# Altium PCB HFPB_01-PCB.PcbDoc (part 3 of 5)
Units mm, origin at the board's own origin, x right, y up, seen from the top; angles counter-clockwise.
Board outline 125 x 200 mm, 8 copper layers (Top Layer, Signal Layer 1, Signal Layer 2, Signal Layer 3, Signal Layer 4, Signal Layer 5, Signal Layer 6, Bottom Layer), stack 1.53 mm thick; 382 components, 179 nets, 1080 pads, 272 vias.
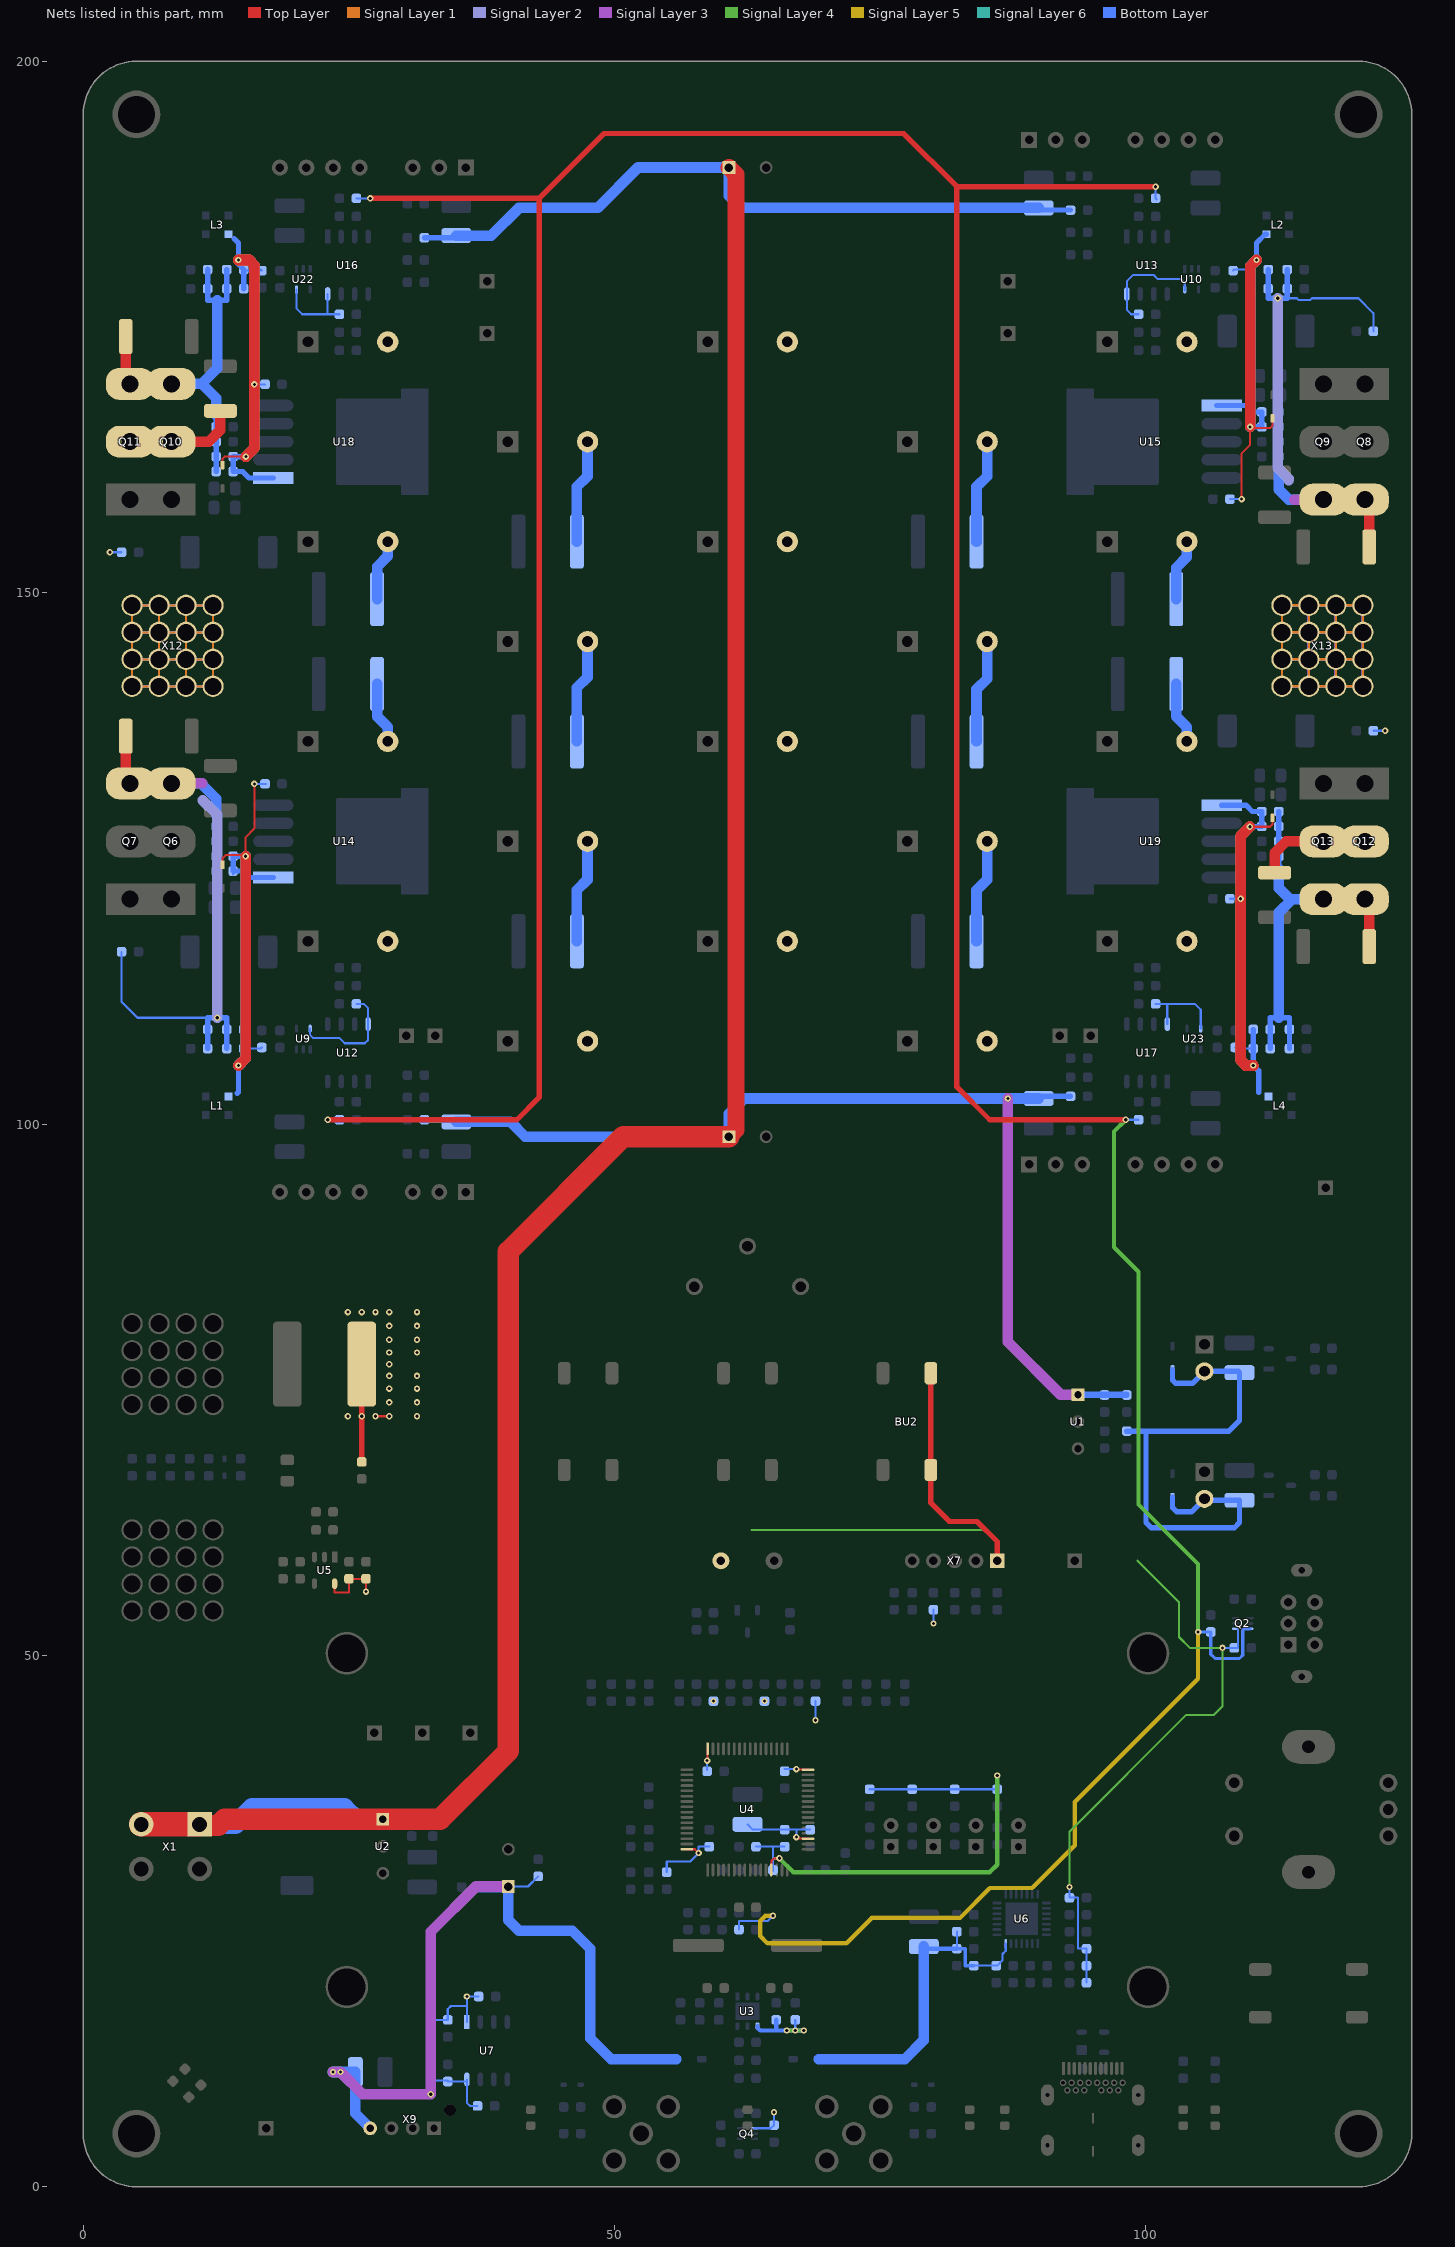
[diagram p8: the nets of this part, all layers, seen from the top]

## Part data (continued)
X10 X11 X12 X13: "Screw Terminal M6 16 pin", Manufacturer="Wurth Elektronik", Package/Case="Through Hole", CompType=Connector, Datasheet link=https://www.we-online.de/katalog/datasheet/7461097.pdf, Digikey link=https://www.digikey.com/en/products/detail/w%C3%BCrth-elektronik/7461097/2682508, Digikey number=732-3217-ND, Mating with="M6 connector", Mouser link=https://www.mouser.com/ProductDetail/Wurth-Elektronik/7461097/?qs=%2Fha2pyFaduivfHmPS%2FalO0LxillnNa7WBZ9739yqip0%3D, Mouser number=710-7461097, Part Description="Screw Terminal M6 16 pin", Part number=7461097, Price per 1p (1), $=5.15, Price per 1p (1000), $=3.00
Y1: library part ECS-80-20-5PX-TR, "Crystal 8MHz", Manufacturer="ECS Inc.", Package/Case=HC-49/US, Value1=20pF, Value2=30ppm, Value3=60Ohm, CompType=Crystal, Datasheet link=https://ecsxtal.com/store/pdf/csm-7x.pdf, Digikey link=https://www.digikey.com/product-detail/en/ecs-inc/ECS-80-20-5PX-TR/XC2076CT-ND/5875560, Digikey number=XC2076CT-ND, Mouser link=https://www.mouser.com/ProductDetail/ECS/ECS-80-20-5PX-TR?qs=wYonFgBYHKlzFXpOtPA%2FIw%3D%3D, Mouser number=520-80-20-5PX-T, Part Description="Crystal 8MHz 20pF 30ppm", Part number=ECS-80-20-5PX-TR, Price per 1p (1), $=0.30, Price per 1p (1000), $=0.18

## Free pads (board coordinates)
  round 4 hole 3.5: 0(24.8,18.8) 0(24.8,50.2) 0(100.2,18.8) 0(100.2,50.2)

## Via types
v1: diameter 0.6, hole 0.3, Top Layer to Bottom Layer, tented both sides, 272 vias

## Nets (pads, with @x,y where several pads share a name; then routed paths per layer and width w, separated by ;. In a path a pad name is that pad's centre, name@x,y a point inside that pad or via, vN(x,y) a via of type N, cw(c..) or ccw(c..) an arc to the next point about the centre after c; other vN are vias at no path point)
+3.3V: BU2.3 BU2.4 C18.1 C21.1 C22.1 C23.1 C24.1 C25.1 C31.1 C36.1 FB4.1 LS1.P Q2.4 Q4.4 R18.2 R19.1 R34.1 R42.2 R46.2 R56.2 R57.2 R58.2 R59.2 R71.2 R72.2 R76.2 R77.2 R78.2 R80.2 U3.4 U4.19 U4.32 U4.48 U4.64 U5.5 U7.1 X7.1 | length 152.7
  Top Layer w0.2: U5.5@23.65,56.75 23.65,55.9 25,55.9 C31.1@25,57.2 R42.2@26.6,57.2 v1(26.6,56) ; U4.64@56.8,31.75 57.55,31.75 v1(57.9,31.4) ; v1(58.7,40.1) 58.75,40.15 U4.48@58.75,41.2 ; v1(67.1,32.9) 67.25,32.75 U4.19@68.2,32.75 ; v1(67.1,39.3) 67.15,39.25 U4.32@68.2,39.25
  Top Layer w0.5: BU2.4@79.75,76.55 BU2.3@79.75,67.45 79.75,64.35 81.5,62.6 84.1,62.6 86,60.7 X7.1@86,58.9
  Signal Layer 4 w0.2: 62.9,61.8 85,61.8 86,60.8 X7.1@86,58.9 ; v1(92.8,28.2) 92.8,33.4 103.8,44.4 106.4,44.4 107.2,45.2 v1(107.2,50.7) 104.125,50.7 103.1,51.725 103.1,55 99.2,58.9
  Signal Layer 4 w0.4: v1(66.2,14.7) v1(67,14.7) v1(67.8,14.7)
  Bottom Layer w0.2: R72.2@32.7,15.7 R71.2@34.3,15.7 34.3,16.7 34.6,17 36.095,17 ; U7.1@36.095,15.5 36.095,17 ; C36.1@37.2,17.9 v1(36.095,17.9) 36.095,17 ; R80.2@54.9,29.6 54.9,30.6 57.1,30.6 v1(57.9,31.4) 57.9,32 C23.1@58.9,32 ; C22.1@58.7,39.2 v1(58.7,40.1) ; C25.1@62.5,34.1 63,33.6 FB4.1@66,33.6 67.1,33.6 ; Q4.4@63.175,5.5 64.7,5.5 R34.1@65,5.8 v1(65,7) ; C21.1@66,39.3 v1(67.1,39.3) ; v1(67,14.7) R19.1@67,15.7 ; v1(67.1,32.9) 67.1,33.6 ; C24.1@68.4,33.6 67.1,33.6 ; v1(68.9,43.9) 68.9,43.8 R77.2@68.9,45.7 ; v1(80,53) R46.2@80,54.3 ; v1(92.8,28.2) R57.2@92.8,27.2 93.6,27.2 93.6,22.4 R58.2@94.4,22.4 R59.2@94.4,20.8 R56.2@94.4,19.2 ; v1(107.2,50.7) R18.2@108.3,50.7 108.65,50.7 108.65,52.45 Q2.4@108.6,52.5
  Bottom Layer w0.4: U3.4@63.45,15.105 63.45,14.95 63.7,14.7 65.1,14.7 ; C18.1@65.2,15.7 65.2,14.8 65.1,14.7 ; v1@66.95,14.7 v1(66.2,14.7) 65.1,14.7 ; v1(67,14.7) v1(67.8,14.7)
  other v1: 59.3,45.7 64.1,45.7
+3.3V': FB10.1 FB11.1 FB12.1 FB13.1 Q2.3 R17.1 R20.2 | length 418
  Top Layer w0.5: v1(23,100.4) 40.8,100.4 42.9,102.5 42.9,187.1 ; v1(27,187.1) 42.9,187.1 ; v1(98.1,100.4) 85.3,100.4 82.2,103.5 82.2,188.2 ; v1(100.9,188.2) 82.2,188.2 ; 42.9,187.1 49,193.2 77.2,193.2 82.2,188.2
  Signal Layer 4 w0.4: v1(98.1,100.4) 97,99.3 97,88.4 99.3,86.1 99.3,64.2 104.9,58.6 v1(104.9,52.2)
  Signal Layer 5 w0.4: v1(64.9,25.5) 64.2,25.5 63.7,25 63.7,23.6 64.4,22.9 71.8,22.9 74.2,25.3 82.5,25.3 85.3,28.1 89.3,28.1 93.3,32.1 93.3,36.2 104.9,47.8 v1(104.9,52.2)
  Bottom Layer w0.2: v1(23,100.4) FB10.1@24.1,100.4 ; FB12.1@25.7,187.1 v1(27,187.1) ; R17.1@61.7,24.2 61.7,25 64.4,25 v1(64.9,25.5) ; v1(98.1,100.4) 98,100.4 FB13.1@99.3,100.4 ; v1(100.9,188.2) FB11.1@100.9,187.1 FB11.1@101,187
  Bottom Layer w0.3: v1(104.9,52.2) R20.2@106.1,52.2 106.1,50.1 106.5,49.7 108.8,49.7 109.1,50 109.1,52.4 109.2,52.5 Q2.3@109.775,52.5
+3.3VA: C28.1 C29.1 FB4.2 R2.2 R22.2 R74.2 R75.2 U4.13 | length 51.7
  Top Layer w0.2: U4.13@64.75,29.8 64.75,30.65 65,30.9 v1(65.5,30.9)
  Signal Layer 4 w0.4: v1(65.5,30.9) 66.8,29.6 85.3,29.6 86,30.3 v1(86,38.7)
  Bottom Layer w0.2: C29.1@63.3,32 FB4.2@66,32 64.9,32 ; 64.6,32 64.9,32 ; C28.1@64.9,29.7 C28.1@64.9,29.8 64.9,30.9 ; v1(65.5,30.9) 64.9,30.9 ; R22.2@74,37.4 R2.2@78,37.4 R75.2@82,37.4 R74.2@86,37.4 v1(86,38.7) ; 64.9,30.9 64.9,32
+5.0V: C11.P C12.1 C34.1 C35.1 D4.A FB2.1 R69.2 R70.2 U7.8 X9.4 | length 85.8
  Signal Layer 3 w1: v1(23.5,10.8) v1(24.2,10.8) 26.3,8.7 v1(32.7,8.7) 32.7,24 36.95,28.25 C11.P@40,28.25
  Bottom Layer w0.2: C34.1@25.6,10.6 C34.1@25.8,10.8 ; v1(32.7,8.7) R69.2@32.7,9.9 ; R69.2@32.7,10 34.3,10 R70.2@34.3,9.9 U7.8@36.095,9.9 ; U7.8@36.095,10.1 U7.8@36.095,9.9 ; C35.1@37.1,7.6 36.4,7.6 36.095,7.905 U7.8@36.095,9.9 ; C11.P@39.95,28.2 C11.P@40,28.25 41.85,28.25 C12.1@42.8,29.2
  Bottom Layer w1: v1(23.5,10.8) v1(24.2,10.8) C34.1@25.6,10.8 ; C34.1@25.6,10.6 25.6,6.9 X9.4@27,5.5 ; FB2.1@37.2,28.2 C11.P@39.95,28.2 ; C11.P@40,28.25 40,25.1 41,24.1 46,24.1 47.706,22.394 47.706,13.962 49.667,12 D4.A@55.8,12
+5.0V_1: C92.1 U9.5 U12.8 | length 10.8
  Bottom Layer w0.2: U9.5@21.35,108.975 21.35,108.35 21.6,108.1 24.1,108.1 24.6,107.6 26.5,107.6 26.805,107.905 U12.8@26.805,109.4 26.805,110.895 26.4,111.3 C92.1@25.7,111.3
+5.0V_2: C108.1 U16.8 U22.5 | length 8
  Bottom Layer w0.2: U22.5@20.05,178.525 20.05,176.75 20.6,176.2 22.995,176.2 ; U16.8@22.995,178.1 22.995,176.2 ; C108.1@24.1,176.2 22.995,176.2
+5.0V_3: C93.1 U10.5 U13.8 | length 10.7
  Bottom Layer w0.2: C93.1@99.3,176.2 98.6,176.2 98.195,176.605 U13.8@98.195,178.1 98.195,179.295 98.8,179.9 100.7,179.9 101.1,179.5 103.3,179.5 103.65,179.15 U10.5@103.65,178.525 U10.5@103.65,178.425
+5.0V_4: C109.1 U17.8 U23.5 | length 8.2
  Bottom Layer w0.2: C109.1@100.9,111.3 102.005,111.3 ; U17.8@102.005,109.4 102.005,111.3 ; U23.5@105.15,108.975 105.15,110.75 104.6,111.3 102.005,111.3
+5.0V_USB: C37.2 C38.1 D3.A FB5.2 R60.1 R61.1 U6.7 | length 32.2
  Bottom Layer w0.2: C38.1@79.1,22.9 C38.1@79.6,22.4 ; R60.1@82.2,22.4 R61.1@82.2,24 ; FB5.2@83.8,20.8 86,20.8 86.5,21.3 86.5,21.9 86.8,22.2 U6.7@86.8,22.875
  Bottom Layer w0.3: R60.1@82.2,22.4 83,22.4 83,20.8 FB5.2@83.8,20.8
  Bottom Layer w0.4: C38.1@79.6,22.4 R60.1@82.2,22.4
  Bottom Layer w1: D3.A@69.2,12 77.3,12 79.1,13.8 C38.1@79.1,22.6
+5V_1: C80.2 C89.1 C100.2 C101.2 C104.1 C105.1 C112.1 Q6.3 Q7.3 Q10.2 Q11.2 R85.1 R87.2 R99.1 R100.1 X12.1 | length 436.3
  Top Layer w0.2: Q6.3@7.6,132.75 Q6.3@8.3,132.05
  Top Layer w1: R100.1@4,136.5 4,132.45 Q7.3@4.4,132.05 ; Q10.2@8.3,164.2 11.8,164.2 12.9,165.3 C112.1@12.9,167.1
  Signal Layer 3 w0.2: X12.1@4.59,141.19 X12.1@4.59,143.73 X12.1@4.59,146.27 X12.1@4.59,148.81 ; X12.1@4.6,141.18 7.14,141.18 9.68,141.18 X12.1@12.22,141.18 ; X12.1@4.6,143.72 7.14,143.72 9.68,143.72 X12.1@12.22,143.72 ; X12.1@4.6,146.26 7.14,146.26 9.68,146.26 X12.1@12.22,146.26 ; X12.1@4.6,148.8 7.14,148.8 9.68,148.8 X12.1@12.22,148.8 ; X12.1@7.13,141.19 X12.1@7.13,143.73 X12.1@7.13,146.27 X12.1@7.13,148.81 ; X12.1@9.67,141.19 X12.1@9.67,143.73 X12.1@9.67,146.27 X12.1@9.67,148.81 ; X12.1@12.21,141.19 X12.1@12.21,143.73 X12.1@12.21,146.27 X12.1@12.21,148.81
  Signal Layer 3 w1: Q6.3@8.3,132.05 11.192,132.05
  Signal Layer 4 w0.2: X12.1@4.59,141.19 X12.1@4.59,143.73 X12.1@4.59,146.27 X12.1@4.59,148.81 ; X12.1@4.6,141.18 7.14,141.18 9.68,141.18 X12.1@12.22,141.18 ; X12.1@4.6,143.72 7.14,143.72 9.68,143.72 X12.1@12.22,143.72 ; X12.1@4.6,146.26 7.14,146.26 9.68,146.26 X12.1@12.22,146.26 ; X12.1@4.6,148.8 7.14,148.8 9.68,148.8 X12.1@12.22,148.8 ; X12.1@7.13,141.19 X12.1@7.13,143.73 X12.1@7.13,146.27 X12.1@7.13,148.81 ; X12.1@9.67,141.19 X12.1@9.67,143.73 X12.1@9.67,146.27 X12.1@9.67,148.81 ; X12.1@12.21,141.19 X12.1@12.21,143.73 X12.1@12.21,146.27 X12.1@12.21,148.81
  Signal Layer 1 w0.2: X12.1@4.59,141.19 X12.1@4.59,143.73 X12.1@4.59,146.27 X12.1@4.59,148.81 ; X12.1@4.6,141.18 7.14,141.18 9.68,141.18 X12.1@12.22,141.18 ; X12.1@4.6,143.72 7.14,143.72 9.68,143.72 X12.1@12.22,143.72 ; X12.1@4.6,146.26 7.14,146.26 9.68,146.26 X12.1@12.22,146.26 ; X12.1@4.6,148.8 7.14,148.8 9.68,148.8 X12.1@12.22,148.8 ; X12.1@7.13,141.19 X12.1@7.13,143.73 X12.1@7.13,146.27 X12.1@7.13,148.81 ; X12.1@9.67,141.19 X12.1@9.67,143.73 X12.1@9.67,146.27 X12.1@9.67,148.81 ; X12.1@12.21,141.19 X12.1@12.21,143.73 X12.1@12.21,146.27 X12.1@12.21,148.81
  Signal Layer 2 w0.2: X12.1@4.59,141.19 X12.1@4.59,143.73 X12.1@4.59,146.27 X12.1@4.59,148.81 ; X12.1@4.6,141.18 7.14,141.18 9.68,141.18 X12.1@12.22,141.18 ; X12.1@4.6,143.72 7.14,143.72 9.68,143.72 X12.1@12.22,143.72 ; X12.1@4.6,146.26 7.14,146.26 9.68,146.26 X12.1@12.22,146.26 ; X12.1@4.6,148.8 7.14,148.8 9.68,148.8 X12.1@12.22,148.8 ; X12.1@7.13,141.19 X12.1@7.13,143.73 X12.1@7.13,146.27 X12.1@7.13,148.81 ; X12.1@9.67,141.19 X12.1@9.67,143.73 X12.1@9.67,146.27 X12.1@9.67,148.81 ; X12.1@12.21,141.19 X12.1@12.21,143.73 X12.1@12.21,146.27 X12.1@12.21,148.81
  Signal Layer 2 w1: Q6.3@8.3,132.05 Q6.3@9.825,132.05 ; 11.225,130.475 12.6,129.1 v1(12.6,110)
  Signal Layer 5 w0.2: X12.1@4.58,141.2 4.58,143.74 4.58,146.28 X12.1@4.58,148.82 ; X12.1@4.59,141.19 X12.1@7.13,141.19 X12.1@9.67,141.19 X12.1@12.21,141.19 ; X12.1@4.59,143.73 X12.1@7.13,143.73 X12.1@9.67,143.73 X12.1@12.21,143.73 ; X12.1@4.59,146.27 X12.1@7.13,146.27 X12.1@9.67,146.27 X12.1@12.21,146.27 ; X12.1@4.59,148.81 X12.1@7.13,148.81 X12.1@9.67,148.81 X12.1@12.21,148.81 ; X12.1@7.12,141.2 7.12,143.74 7.12,146.28 X12.1@7.12,148.82 ; X12.1@9.66,141.2 9.66,143.74 9.66,146.28 X12.1@9.66,148.82 ; X12.1@12.2,141.2 12.2,143.74 12.2,146.28 X12.1@12.2,148.82
  Signal Layer 6 w0.2: X12.1@4.58,141.2 4.58,143.74 4.58,146.28 X12.1@4.58,148.82 ; X12.1@4.59,141.19 X12.1@7.13,141.19 X12.1@9.67,141.19 X12.1@12.21,141.19 ; X12.1@4.59,143.73 X12.1@7.13,143.73 X12.1@9.67,143.73 X12.1@12.21,143.73 ; X12.1@4.59,146.27 X12.1@7.13,146.27 X12.1@9.67,146.27 X12.1@12.21,146.27 ; X12.1@4.59,148.81 X12.1@7.13,148.81 X12.1@9.67,148.81 X12.1@12.21,148.81 ; X12.1@7.12,141.2 7.12,143.74 7.12,146.28 X12.1@7.12,148.82 ; X12.1@9.66,141.2 9.66,143.74 9.66,146.28 X12.1@9.66,148.82 ; X12.1@12.2,141.2 12.2,143.74 12.2,146.28 X12.1@12.2,148.82
  Bottom Layer w0.2: R99.1@3.6,116.2 3.6,111.5 5.1,110 11.7,110
  Bottom Layer w0.5: C89.1@11.7,107.1 11.7,110 v1(12.6,110) 13.5,110 R85.1@13.5,108.9 C80.2@13.5,107.1 ; C101.2@12.5,123.8 C100.2@12.5,125.2 C104.1@12.5,126.6 C105.1@12.5,128 12.5,129.1
  Bottom Layer w1: Q6.3@8.3,132.05 11.05,132.05 12.5,130.6 12.5,129.1
+5V_2: C50.N C51.N C52.N C53.N C54.N C55.N C56.N C57.N C58.N C59.N C60.N C61.N C62.N C63.N C64.N C65.N C66.N C67.N C68.N C69.N C70.2 C71.2 C72.2 C73.2 C74.2 C75.2 C76.2 C77.2 C78.2 C79.2 C116.2 C117.2 C118.2 C119.2 C120.1 C121.1 C122.1 C123.1 C125.2 C126.2 C132.1 C133.1 Q10.3 Q11.3 Q12.3 Q13.3 R113.1 R114.1 R115.1 R116.1 R117.1 R118.2 R119.1 R120.1 R122.2 R123.2 | length 163.8
  Top Layer w0.2: Q10.3@7.6,170.35 Q10.3@8.3,169.65 ; v1(27.5,72.5) v1(28.8,72.5)
  Top Layer w0.5: R117.1@26.2,68.5 v1(26.2,72.5) R118.2@26.2,77.4
  Top Layer w1: R114.1@4,174.1 4,170.05 Q11.3@4.4,169.65 ; Q12.3@120.6,121.15 121,120.75 R115.1@121,116.7
  Bottom Layer w0.2: v1(2.5,153.8) R113.1@3.6,153.8 ; C132.1@11.7,180.4 C132.1@11.7,180.6 ; R116.1@121.4,137 v1(122.5,137)
  Bottom Layer w0.5: C132.1@11.7,180.4 R122.2@11.7,178.6 11.7,177.5 12.6,177.5 13.5,177.5 R119.1@13.5,178.6 C125.2@13.5,180.4 ; C117.2@12.5,161.4 C116.2@12.5,162.8 C120.1@12.5,164.2 C121.1@12.5,165.6 12.5,166.7 ; C126.2@111.7,107.1 R120.1@111.7,108.9 111.7,110 112.5,110 113.5,110 R123.2@113.5,108.9 C133.1@113.5,107.1 ; 112.5,124 C122.1@112.5,125.2 C123.1@112.5,126.6 C118.2@112.5,128 C119.2@112.5,129.4
  Bottom Layer w1: Q10.3@8.3,169.65 11.15,169.65 ; 12.5,166.7 12.5,168.3 11.15,169.65 ; 12.6,177.5 12.6,171.1 11.15,169.65 ; C78.2@27.65,141.4 27.65,138.35 28.65,137.35 C52.N@28.65,136 ; C79.2@27.65,149.4 27.65,152.45 28.65,153.45 C51.N@28.65,154.8 ; C75.2@46.45,117.2 46.45,122 47.45,123 C56.N@47.45,126.6 ; C76.2@46.45,136 46.45,141.05 47.45,142.05 C55.N@47.45,145.4 ; C77.2@46.45,154.8 46.45,159.95 47.45,160.95 C54.N@47.45,164.2 ; C72.2@84.05,117.2 84.05,122 85.05,123 C64.N@85.05,126.6 ; C73.2@84.05,136 84.05,140.9 85.05,141.9 C63.N@85.05,145.4 ; C74.2@84.05,154.8 84.05,159.95 85.05,160.95 C62.N@85.05,164.2 ; C70.2@102.85,141.4 102.85,138.35 103.85,137.35 C68.N@103.85,136 ; C71.2@102.85,149.4 102.85,152.35 103.85,153.35 C67.N@103.85,154.8 ; 112.5,110 112.5,119.9 113.75,121.15 ; 112.5,124 112.5,122.2 113.55,121.15 113.75,121.15 ; Q13.3@116.7,121.15 113.75,121.15
  other v1: 24.9,72.5 31.4,72.5 28.8,73.8 31.4,73.8 28.8,75.1 31.4,75.1 28.8,76.3 31.4,76.3 28.8,77.4 28.8,78.5 31.4,78.5 28.8,79.7 31.4,79.7 28.8,81 31.4,81 24.9,82.3 26.2,82.3 27.5,82.3 28.8,82.3 31.4,82.3
+5V_3: C81.2 C90.1 C102.2 C103.2 C106.1 C107.1 C113.1 Q8.3 Q9.3 Q12.2 Q13.2 R86.1 R88.2 R101.1 R102.1 X13.1 | length 429.7
  Top Layer w1: C113.1@112.1,123.65 112.1,125.5 113.2,126.6 Q13.2@116.7,126.6 ; Q8.3@120.6,158.75 120.85,158.75 121,158.6 R101.1@121,154.3
  Signal Layer 3 w0.2: X13.1@112.78,141.2 112.78,143.74 112.78,146.28 X13.1@112.78,148.82 ; X13.1@112.79,141.19 X13.1@115.33,141.19 X13.1@117.87,141.19 X13.1@120.41,141.19 ; X13.1@112.79,143.73 X13.1@115.33,143.73 X13.1@117.87,143.73 X13.1@120.41,143.73 ; X13.1@112.79,146.27 X13.1@115.33,146.27 X13.1@117.87,146.27 X13.1@120.41,146.27 ; X13.1@112.79,148.81 X13.1@115.33,148.81 X13.1@117.87,148.81 X13.1@120.41,148.81 ; X13.1@115.32,141.2 115.32,143.74 115.32,146.28 X13.1@115.32,148.82 ; Q9.3@116.7,158.05 116,158.75 Q9.3@116.7,158.75 ; X13.1@117.86,141.2 117.86,143.74 117.86,146.28 X13.1@117.86,148.82 ; X13.1@120.4,141.2 120.4,143.74 120.4,146.28 X13.1@120.4,148.82
  Signal Layer 3 w1: 113.95,158.75 Q9.3@116,158.75
  Signal Layer 4 w0.2: X13.1@112.79,141.19 X13.1@112.79,143.73 X13.1@112.79,146.27 X13.1@112.79,148.81 ; X13.1@112.8,141.18 115.34,141.18 117.88,141.18 X13.1@120.42,141.18 ; X13.1@112.8,143.72 115.34,143.72 117.88,143.72 X13.1@120.42,143.72 ; X13.1@112.8,146.26 115.34,146.26 117.88,146.26 X13.1@120.42,146.26 ; X13.1@112.8,148.8 115.34,148.8 117.88,148.8 X13.1@120.42,148.8 ; X13.1@115.33,141.19 X13.1@115.33,143.73 X13.1@115.33,146.27 X13.1@115.33,148.81 ; X13.1@117.87,141.19 X13.1@117.87,143.73 X13.1@117.87,146.27 X13.1@117.87,148.81 ; X13.1@120.41,141.19 X13.1@120.41,143.73 X13.1@120.41,146.27 X13.1@120.41,148.81
  Signal Layer 1 w0.2: X13.1@112.79,143.73 X13.1@112.79,141.19 X13.1@115.33,141.19 ; X13.1@112.79,143.73 X13.1@112.79,146.27 ; X13.1@112.79,143.73 X13.1@115.33,143.73 ; X13.1@112.79,146.27 X13.1@112.79,148.81 X13.1@115.33,148.81 ; X13.1@112.79,146.27 X13.1@115.33,146.27 ; X13.1@115.33,141.19 X13.1@115.33,143.73 ; X13.1@115.33,141.19 X13.1@117.87,141.19 ; X13.1@115.33,143.73 X13.1@117.87,143.73 ; X13.1@115.33,143.73 X13.1@115.33,146.27 ; X13.1@115.33,146.27 X13.1@115.33,148.81 ; X13.1@115.33,146.27 X13.1@117.87,146.27 ; X13.1@115.33,148.81 X13.1@117.87,148.81 ; X13.1@117.87,141.19 X13.1@117.87,143.73 ; X13.1@117.87,141.19 X13.1@120.41,141.19 X13.1@120.41,143.73 ; X13.1@117.87,143.73 X13.1@117.87,146.27 ; X13.1@117.87,143.73 X13.1@120.41,143.73 ; X13.1@117.87,146.27 X13.1@117.87,148.81 ; X13.1@117.87,146.27 X13.1@120.41,146.27 ; X13.1@117.87,148.81 X13.1@120.41,148.81 X13.1@120.41,146.27 ; X13.1@120.41,143.73 X13.1@120.41,146.27
  Signal Layer 2 w0.2: X13.1@112.78,141.2 112.78,143.74 112.78,146.28 X13.1@112.78,148.82 ; X13.1@112.79,141.19 X13.1@115.33,141.19 X13.1@117.87,141.19 X13.1@120.41,141.19 ; X13.1@112.79,143.73 X13.1@115.33,143.73 X13.1@117.87,143.73 X13.1@120.41,143.73 ; X13.1@112.79,146.27 X13.1@115.33,146.27 X13.1@117.87,146.27 X13.1@120.41,146.27 ; X13.1@112.79,148.81 X13.1@115.33,148.81 X13.1@117.87,148.81 X13.1@120.41,148.81 ; X13.1@115.32,141.2 115.32,143.74 115.32,146.28 X13.1@115.32,148.82 ; X13.1@117.86,141.2 117.86,143.74 117.86,146.28 X13.1@117.86,148.82 ; X13.1@120.4,141.2 120.4,143.74 120.4,146.28 X13.1@120.4,148.82
  Signal Layer 2 w1: v1(112.4,177.7) 112.4,161.75 113.425,160.725 113.425,160.6 ; Q9.3@115.4,158.75 Q9.3@116.7,158.75
  Signal Layer 5 w0.2: X13.1@112.79,141.19 X13.1@112.79,143.73 X13.1@112.79,146.27 X13.1@112.79,148.81 ; X13.1@112.8,141.18 115.34,141.18 117.88,141.18 X13.1@120.42,141.18 ; X13.1@112.8,143.72 115.34,143.72 117.88,143.72 X13.1@120.42,143.72 ; X13.1@112.8,146.26 115.34,146.26 117.88,146.26 X13.1@120.42,146.26 ; X13.1@112.8,148.8 115.34,148.8 117.88,148.8 X13.1@120.42,148.8 ; X13.1@115.33,141.19 X13.1@115.33,143.73 X13.1@115.33,146.27 X13.1@115.33,148.81 ; X13.1@117.87,141.19 X13.1@117.87,143.73 X13.1@117.87,146.27 X13.1@117.87,148.81 ; X13.1@120.41,141.19 X13.1@120.41,143.73 X13.1@120.41,146.27 X13.1@120.41,148.81
  Signal Layer 6 w0.2: X13.1@112.78,141.2 112.78,143.74 112.78,146.28 X13.1@112.78,148.82 ; X13.1@112.79,141.19 X13.1@115.33,141.19 X13.1@117.87,141.19 X13.1@120.41,141.19 ; X13.1@112.79,143.73 X13.1@115.33,143.73 X13.1@117.87,143.73 X13.1@120.41,143.73 ; X13.1@112.79,146.27 X13.1@115.33,146.27 X13.1@117.87,146.27 X13.1@120.41,146.27 ; X13.1@112.79,148.81 X13.1@115.33,148.81 X13.1@117.87,148.81 X13.1@120.41,148.81 ; X13.1@115.32,141.2 115.32,143.74 115.32,146.28 X13.1@115.32,148.82 ; X13.1@117.86,141.2 117.86,143.74 117.86,146.28 X13.1@117.86,148.82 ; X13.1@120.4,141.2 120.4,143.74 120.4,146.28 X13.1@120.4,148.82
  Bottom Layer w0.2: 113.3,177.7 114.186,177.7 114.336,177.55 115.464,177.55 115.614,177.7 120,177.7 121.4,176.3 R102.1@121.4,174.6 ; R88.2@113.3,178.5 113.2,178.6 R88.2@113.3,178.7
  Bottom Layer w0.5: C81.2@111.5,180.4 R86.1@111.5,178.6 111.5,177.7 v1(112.4,177.7) 113.3,177.7 R88.2@113.3,178.5 ; 112.5,161.6 C107.1@112.5,162.8 C106.1@112.5,164.2 C103.2@112.5,165.6 C102.2@112.5,167 ; R88.2@113.3,178.7 C90.1@113.3,180.4
  Bottom Layer w1: 112.5,161.6 112.5,159.7 113.45,158.75 Q9.3@116.7,158.75
+12V: C1.1 C14.1 D1.C D7.C FB1.1 X2.2 X4.2 | length 51.4
  Bottom Layer w0.2: X4.2@105.5,64.73 X4.2@105.63,64.6
  Bottom Layer w0.5: FB1.1@98.2,71.1 100,71.1 ; D7.C@102.5,64.9 102.5,63.9 102.9,63.5 104.27,63.5 X4.2@105.5,64.73 ; D1.C@102.5,76.9 102.5,75.9 102.8,75.6 104.37,75.6 X2.2@105.5,76.73 108.67,76.73 C1.1@108.8,76.6 108.8,72.1 107.8,71.1 100,71.1 ; X4.2@105.63,64.6 C14.1@108.8,64.6 108.8,62.5 108.3,62 100.5,62 100,62.5 100,71.1
+15V_1: C80.1 C100.1 C101.1 D10.C FB7.1 L1.3 R85.2 R89.2 U14.1 | length 105.7
  Top Layer w0.2: D10.C@13.1,124.4 13.1,125 13.4,125.3 15.175,125.3 v1(15.275,125.2) 15.275,126.975 16.1,127.8 v1(16.1,132)
  Top Layer w1: v1(14.6,105.5) 15.275,106.175 v1(15.275,125.2)
  Signal Layer 4 w1: v1(14.6,105.5) 15.275,106.175 v1(15.275,125.2)
  Signal Layer 2 w1: v1(14.6,105.5) 15.275,106.175 v1(15.275,125.2)
  Signal Layer 6 w1: v1(14.6,105.5) 15.275,106.175 v1(15.275,125.2)
  Bottom Layer w0.2: C101.1@14.1,123.5 C101.1@14.4,123.8 ; C80.1@15.1,107.1 16.7,107.1 FB7.1@16.8,107.2 ; v1(16.1,132) R89.2@17.1,132 R89.2@17.2,132
  Bottom Layer w0.5: C101.1@14.1,123.8 C100.1@14.1,125.2 v1(15.275,125.2) ; C101.1@14.4,123.8 14.896,123.8 15.5,123.196 U14.1@17.88,123.196 ; 14.5,102.9 14.6,103 v1(14.6,105.5) 15.1,106 C80.1@15.1,107.1 R85.2@15.1,108.8
+15V_2: C116.1 C117.1 C125.1 D14.C FB16.1 L3.2 R103.2 R119.2 U18.1 | length 97.7
  Top Layer w0.2: D14.C@13.1,162 13.1,162.6 13.3,162.8 v1(15.3,162.8)
  Top Layer w1: v1(14.6,181.3) 15.603,181.3 16.1,180.803 v1(16.1,169.6) 16.1,163.6 v1(15.3,162.8)
  Signal Layer 3 w1: v1(14.6,181.3) 15.603,181.3 16.1,180.803 v1(16.1,169.6) 16.1,163.6 v1(15.3,162.8)
  Signal Layer 1 w1: v1(14.6,181.3) 15.603,181.3 16.1,180.803 v1(16.1,169.6) 16.1,163.6 v1(15.3,162.8)
  Signal Layer 5 w1: v1(14.6,181.3) 15.603,181.3 16.1,180.803 v1(16.1,169.6) 16.1,163.6 v1(15.3,162.8)
  Bottom Layer w0.2: C125.1@15.1,180.2 15.2,180.3 FB16.1@16.8,180.3 FB16.1@16.7,180.4 ; v1(16.1,169.6) R103.2@17.1,169.6
  Bottom Layer w0.5: 14.175,183.325 14.6,182.9 v1(14.6,181.3) 14.6,180.9 C125.1@15.1,180.4 15.1,180.2 R119.2@15.1,178.6 ; v1(15.3,162.8) C116.1@14.1,162.8 C117.1@14.1,161.4 15,161.4 15.604,160.796 U18.1@17.88,160.796
+15V_3: C81.1 C102.1 C103.1 D11.C FB8.1 L2.3 R86.2 R90.1 U15.1 | length 89.6
  Top Layer w0.2: v1(109,158.8) 109,163.1 109.8,163.9 v1(109.8,165.6) 109.9,165.5 111.7,165.5 111.9,165.7 D11.C@111.9,166.4
  Top Layer w1: v1(109.8,165.6) 109.8,180.7 v1(110.4,181.3)
  Signal Layer 4 w1: v1(109.8,165.6) 109.8,180.7 v1(110.4,181.3)
  Signal Layer 2 w1: v1(109.8,165.6) 109.8,180.7 v1(110.4,181.3)
  Signal Layer 6 w1: v1(109.8,165.6) 109.8,180.7 v1(110.4,181.3)
  Bottom Layer w0.2: R90.1@107.9,158.8 v1(109,158.8) ; FB8.1@108.2,180.3 108.3,180.4 109.8,180.4 C81.1@109.9,180.3
  Bottom Layer w0.5: U15.1@106.65,167.604 U15.1@107.12,167.604 109.396,167.604 110,167 C102.1@110.9,167 C103.1@110.9,165.6 v1(109.8,165.6) ; R86.2@109.9,178.6 C81.1@109.9,180.3 ; C81.1@109.9,180.4 109.9,181.1 110.1,181.3 v1(110.4,181.3) 110.4,182.9 111.225,183.725 L2.3@111.325,183.725
+15V_4: C118.1 C119.1 C126.1 D15.C FB17.1 L4.2 R104.1 R120.2 U19.1 | length 113.3
  Top Layer w0.2: v1(109.775,127.975) 111.675,127.975 111.9,128.2 D15.C@111.9,128.8
  Top Layer w1: v1(109.775,127.975) 108.9,127.1 v1(108.9,121.2) 108.9,105.997 109.397,105.5 v1(110.1,105.5)
  Signal Layer 3 w1: v1(109.775,127.975) 108.9,127.1 v1(108.9,121.2) 108.9,105.997 109.397,105.5 v1(110.1,105.5)
  Signal Layer 1 w1: v1(109.775,127.975) 108.9,127.1 v1(108.9,121.2) 108.9,105.997 109.397,105.5 v1(110.1,105.5)
  Signal Layer 5 w1: v1(109.775,127.975) 108.9,127.1 v1(108.9,121.2) 108.9,105.997 109.397,105.5 v1(110.1,105.5)
  Bottom Layer w0.2: R104.1@107.9,121.2 v1(108.9,121.2) ; FB17.1@108.4,107.2 108.5,107.1 C126.1@110.1,107.1
  Bottom Layer w0.5: U19.1@107.12,130.004 109.396,130.004 110,129.4 C119.1@110.9,129.4 C118.1@110.9,128 109.75,128 v1(109.775,127.975) ; R120.2@110.1,108.9 C126.1@110.1,107.1 v1(110.1,105.5) 110.6,105 110.6,103
+(15-30)V: C2.1 C3.1 C5.P C6.P C8.1 C9.1 C88.1 C91.1 C131.1 C134.1 D2.C FB6.1 FB9.1 FB14.1 FB15.1 U1.1 U2.1 X1.1 X1.3 | length 396.6
  Top Layer w1.6: C6.P@60.75,98.8 61.4,99.45 61.4,189.35 C5.P@60.75,190
  Top Layer w2: X1.1@10.95,34.1 11.05,34 12.7,34 13.28,34.58 U2.1@28.2,34.58 33.58,34.58 40,41 40,88 50.8,98.8 C6.P@60.75,98.8
  Top Layer w2.3: X1.3@5.45,34.1 X1.1@10.95,34.1
  Signal Layer 3 w1: v1(87,102.4) 87,79.5 91.96,74.54 U1.1@93.6,74.54
  Bottom Layer w0.3: C2.1@98.16,74.54 C2.1@98.2,74.5
  Bottom Layer w0.4: C131.1@34.9,183.4 C131.1@35.1,183.6
  Bottom Layer w0.5: U2.1@28.2,34.58 32.88,34.58 C9.1@32.9,34.6 ; FB6.1@32.1,100.4 C88.1@34.9,100.4 ; FB14.1@32.1,183.4 C131.1@34.9,183.4 ; C91.1@89.9,186.2 90.1,186 FB9.1@92.9,186 ; C134.1@90.1,102.6 FB15.1@92.9,102.6
  Bottom Layer w0.6: U1.1@93.6,74.54 C2.1@98.16,74.54
  Bottom Layer w1: C88.1@35.1,100.2 40.2,100.2 41.6,98.8 C6.P@60.75,98.8 60.75,100.95 62.2,102.4 v1(87,102.4) C134.1@89.9,102.4 ; C131.1@35.1,183.6 38.4,183.6 41,186.2 48.4,186.2 52.2,190 C5.P@60.75,190 60.75,187.35 61.9,186.2 C91.1@89.9,186.2
  Bottom Layer w1.8: X1.1@10.95,34.1 14.3,34.1 15.86,35.66 D2.C@20.1,35.66 24.565,35.66 25.625,34.6 28.18,34.6 U2.1@28.2,34.58
  Bottom Layer w2: X1.3@5.45,34.1 X1.1@10.95,34.1